# Altium PCB SM619GEFDFST.PcbDoc (part 2 of 3)
Units mm, origin at the board's own origin, x right, y up, seen from the top; angles counter-clockwise.
Board outline 101.04 x 68 mm, 8 copper layers (Top Layer, GND, VCC3+CORE, Signal 1, +5V SATA, Middle Layer 1, GND (Mid8), Bottom Layer), stack 0.633 mm thick; 196 components, 107 nets, 647 pads, 641 vias.
Unrouted connection lines stored in the file: 30.
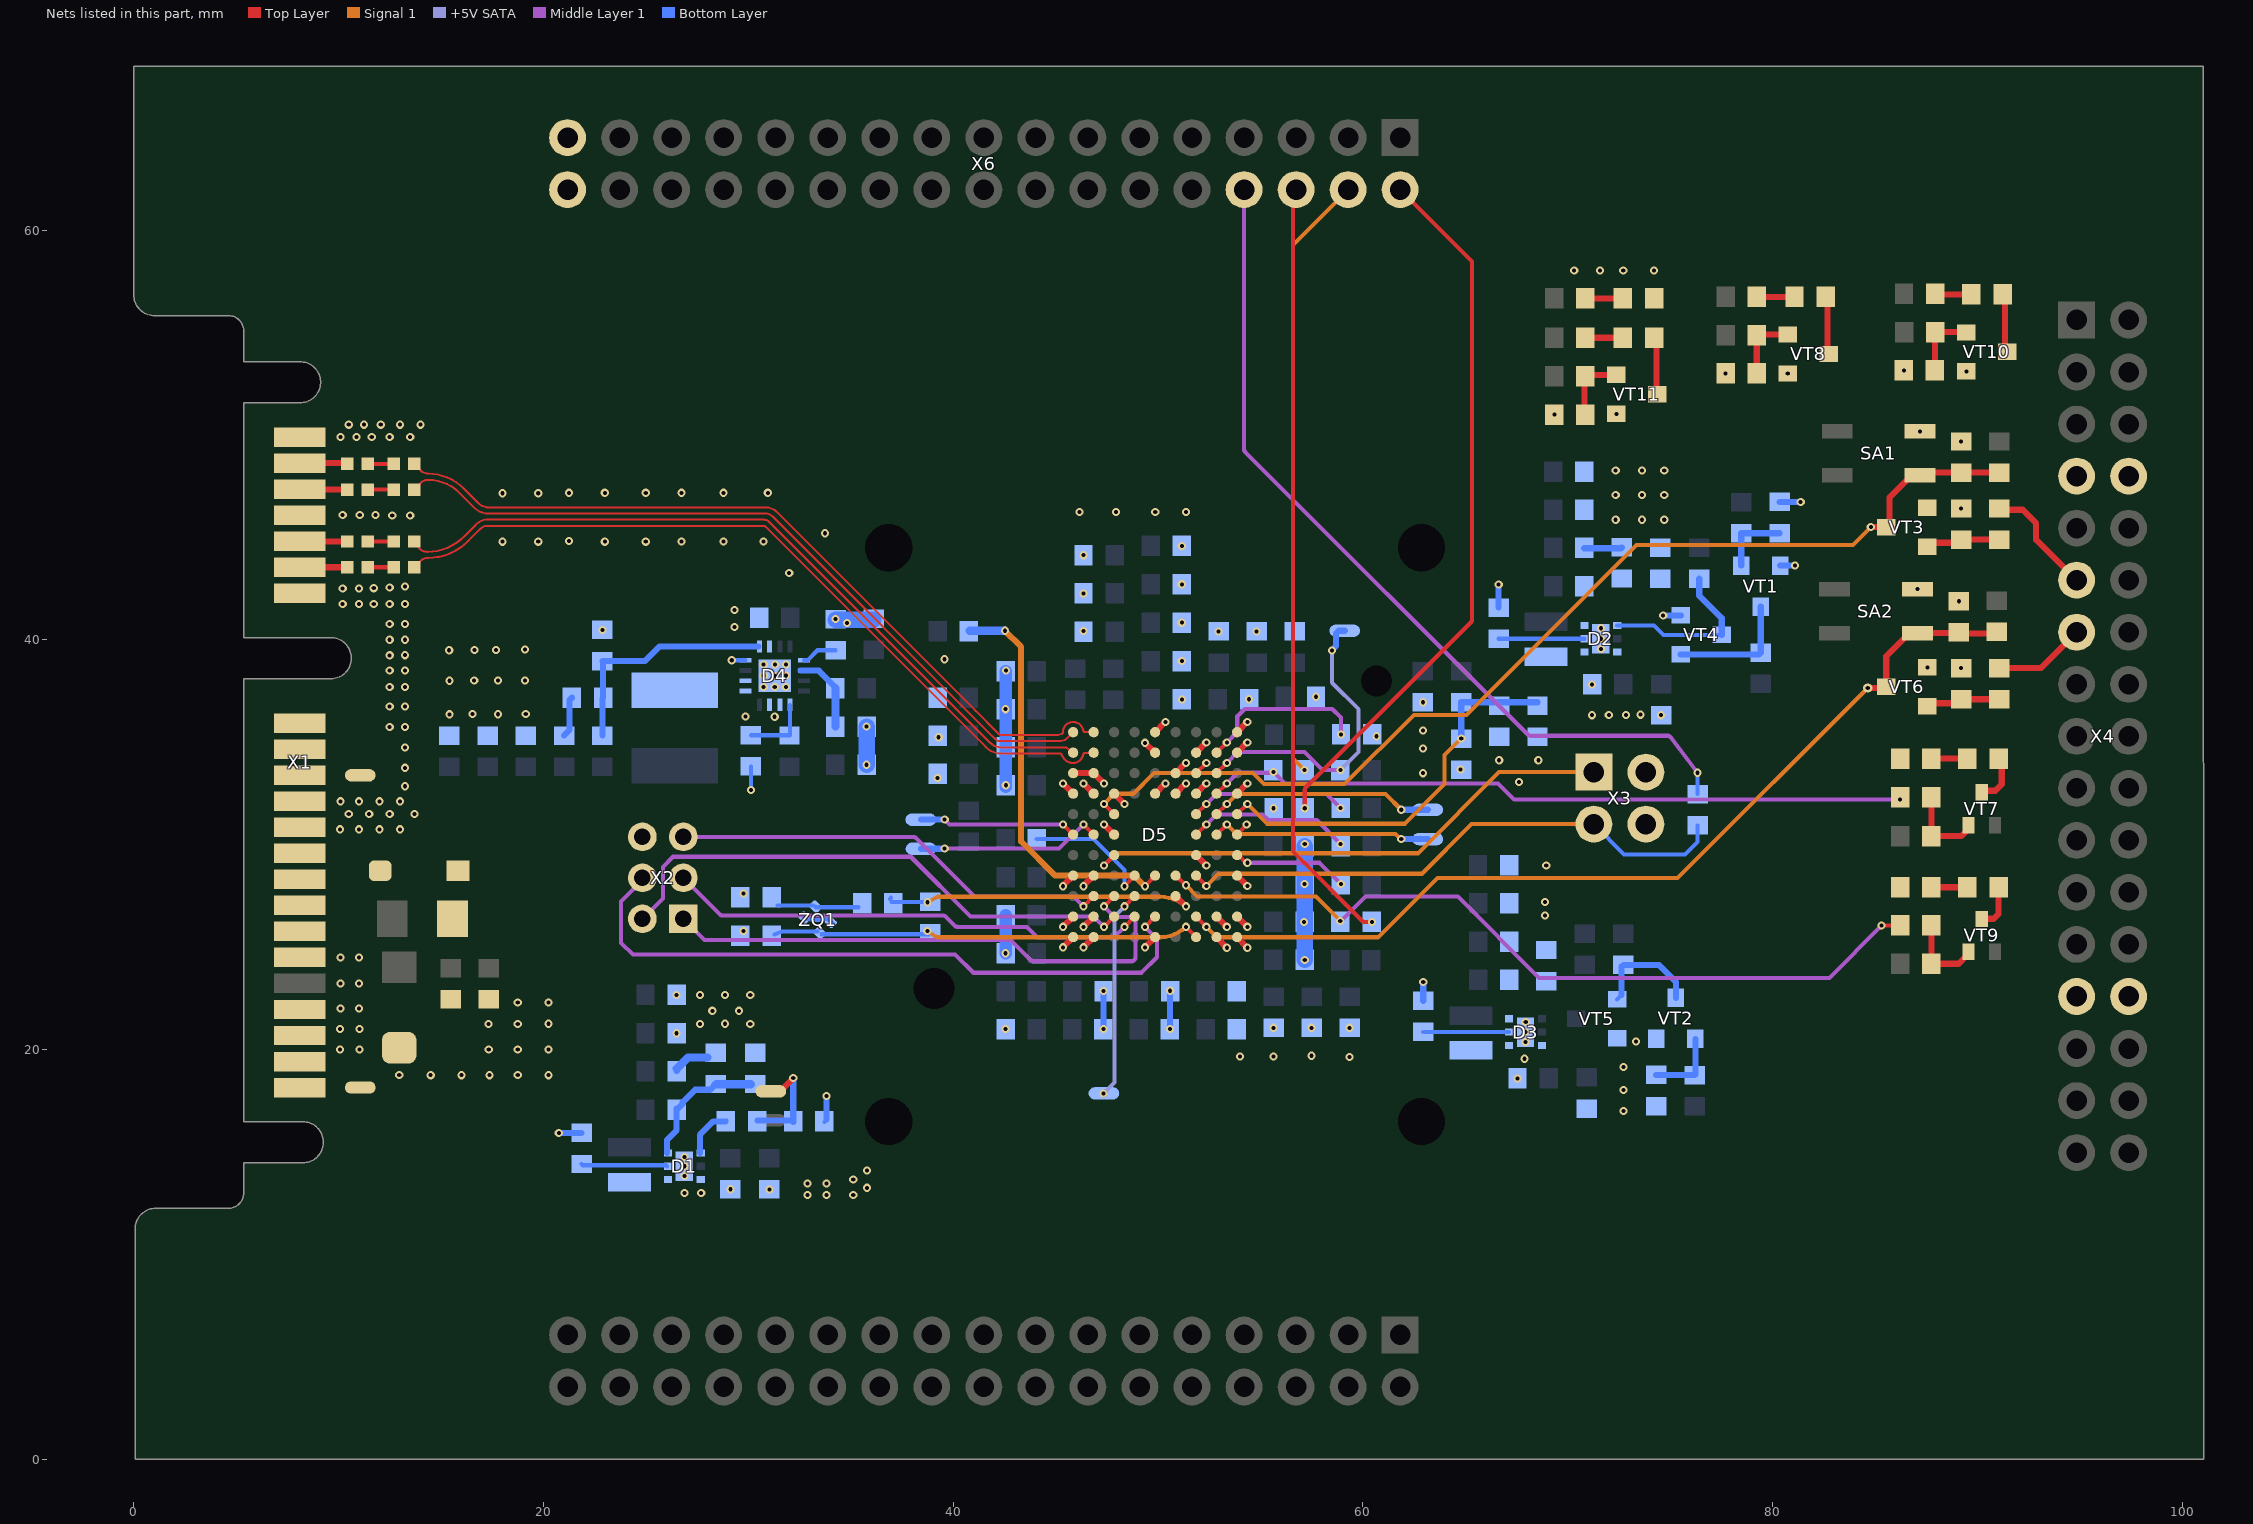
[diagram p8: the nets of this part, all layers, seen from the top]

## Via types
v1: diameter 0.4, hole 0.2, Top Layer to Bottom Layer, tented both sides, 636 vias
v2: diameter 0.4, hole 0.2, Top Layer to Bottom Layer, 3 vias
v3: diameter 0.45, hole 0.2, Top Layer to Bottom Layer, tented both sides, 2 vias

## Nets (pads, with @x,y where several pads share a name; then routed paths per layer and width w, separated by ;. In a path a pad name is that pad's centre, name@x,y a point inside that pad or via, vN(x,y) a via of type N, cw(c..) or ccw(c..) an arc to the next point about the centre after c; other vN are vias at no path point) (continued)
GND: C1.1 C2.1 C3.1 C4.1 C5.2 C6.1 C7.1 C12.2 C16.2 C17.1 C18.2 C19.2 C20.1 C21.2 C22.2 C23.2 C24.2 C25.2 C26.2 C27.2 C28.2 C29.2 C30.2 C31.2 C32.2 C33.2 C34.2 C35.2 C36.2 C37.2 C38.2 C39.2 C40.2 C41.2 C42.2 C43.2 C44.1 C45.2 C46.2 C47.2 C48.2 C49.2 C50.2 C51.2 C52.2 C53.2 C54.2 C55.2 C56.2 C57.2 C59.2 C60.2 C61.2 C62.2 C63.2 C64.2 C65.2 C66.2 C67.2 C68.2 C69.2 C70.2 C71.2 C72.2 C73.2 D1.6 D1.7 D2.6 D2.7 D3.6 D3.7 D4.6 D4.14 D4.15 D4.17 D5.A1 D5.A2 D5.A5 D5.A8 D5.A9 D5.B1 D5.B2 D5.B8 D5.B9 D5.D1 D5.D8 D5.D9 D5.E3 D5.F7 D5.H1 D5.H3 D5.H4 D5.H5 D5.H7 D5.H8 D5.H9 D5.J3 D5.J4 D5.J8 D5.J9 D5.K1 D5.K3 D5.K5 D5.L1 D5.L5 R3.1 R4.1 R8.1 R11.2 R14.1 R15.1 R25.1 R26.2 R27.2 R31.1 R33.2 R47.2 R59.1 R65.1 R66.2 R73.2 R74.1 R75.1 SA1.4 SA2.4 VD2.1 VD3.2 VT1.2 VT2.2 VT3.2 VT4.2 VT5.2 VT6.2 VT8.2 VT10.2 VT11.2 X1.1 X1.4 X1.7 X1.11 X1.12 X1.13 X1.17 X1.19 X2.6 X3.2 X3.4 X4.4 X4.14 X4.21 X4.31 X6.17 X6.34 ZQ1.2 ZQ1.4 | length 50.5
  Top Layer w0.2: D5.J3@51.861,33.49 v1(52.361,33.99)
  Top Layer w0.3: v1(45.361,24.99) D5.A9@45.861,25.49 ; v1(45.361,25.99) D5.B9@45.861,26.49 ; v1(45.361,27.97) 45.409,28.034 cw(c45.649,27.853) 45.437,28.066 D5.D9@45.861,28.49 ; v1(45.361,32.99) D5.H9@45.861,32.49 ; D5.J9@45.861,33.49 D5.J8@46.861,33.49 v1(47.361,32.99) ; v1(46.361,24.99) D5.A8@46.861,25.49 ; v1(46.361,25.99) D5.B8@46.861,26.49 ; v1(46.361,27.97) 46.409,28.034 cw(c46.649,27.853) 46.437,28.066 D5.D8@46.861,28.49 ; v1(46.361,32.99) D5.H8@46.861,32.49 ; v1(47.361,30.99) D5.F7@47.861,30.49 ; D5.H7@47.861,32.49 v1(48.361,31.99) ; v1(49.361,24.99) D5.A5@49.861,25.49 ; v1(49.361,34.972) D5.K5@49.861,34.49 ; D5.H5@49.861,32.49 v1(50.361,32.99) ; D5.L5@49.861,35.49 v1(50.361,35.99) ; D5.H4@50.861,32.49 v1(51.361,32.99) ; D5.J4@50.861,33.49 v1(51.361,33.99) ; D5.E3@51.861,29.49 v1(52.361,28.99) ; D5.H3@51.861,32.49 v1(52.361,32.99) ; D5.K3@51.861,34.49 v1(52.361,34.99) ; D5.A2@52.861,25.49 52.861,25.48 53.361,24.98 v1(53.361,24.97) ; D5.B2@52.861,26.49 v1(53.361,25.99) ; D5.A1@53.861,25.49 53.861,25.48 54.361,24.98 v1(54.361,24.97) ; D5.B1@53.861,26.49 v1(54.361,25.99) ; D5.D1@53.861,28.49 v1(54.361,27.99) ; D5.H1@53.861,32.49 v1(54.361,32.99) ; D5.K1@53.861,34.49 v1(54.361,34.99) ; D5.L1@53.861,35.49 v1(54.361,35.99)
  Bottom Layer w0.2: v1(30.135,32.67) C39.2@30.135,33.82 ; ZQ1.2@32.749,26.442 32.905,26.368 32.906,26.367 ccw(c33.335,28.454) 33.734,26.362 cw(c33.793,26.045) 34.064,26.219 ZQ1.4@34.125,26.125
  Bottom Layer w0.3: v1(20.756,15.933) R8.1@21.865,15.933 ; v1(35.775,33.9) C30.2@35.777,33.902 ; C29.2@36.097,41.01 C29.2@36.117,41.03 ; v1(47.336,21) 47.341,21 v1(47.341,22.865) ; v1(50.585,21.01) 50.595,21.01 v1(50.595,22.87) ; R15.1@62.95,22.38 v1(62.95,23.3) ; R14.1@66.63,41.57 v1(66.63,42.7) ; v1(74.66,41.19) VT4.2@75.52,41.19 ; R3.1@80.35,46.73 v1(81.37,46.73) ; VT1.2@80.37,43.62 v1(81.1,43.62)
  Bottom Layer w0.6: v1(42.565,24.7) C60.2@42.565,26.55 ; C45.2@42.565,32.811 C31.2@42.565,38.47
  Bottom Layer w0.8: C57.2@34.267,40.985 C29.2@36.097,40.985 ; C30.2@35.777,33.902 v1(35.777,35.762) ; C47.2@57.155,24.38 C55.2@57.155,29.93
  other v1: 32.9,12.906 33.828,12.906 35.124,12.906 26.892,13 27.705,13 35.791,13.25 32.9,13.456 33.828,13.456 35.124,13.654 26.887,13.829 35.791,14.099 26.887,14.304 26.887,14.759 72.72,17 72.72,18.02 67.55,18.59 12.965,18.765 14.5,18.75 16,18.75 17.375,18.75 18.75,18.765 20.25,18.75 72.72,19.15 67.885,19.55 59.355,19.63 54,19.66 55.645,19.66 57.495,19.695 10.075,20 11.021,20 17.335,20 18.75,20 20.25,20 67.94,20.374 73.34,20.394 26.505,20.797 67.94,20.85 10.075,21 11.021,21 42.56,21 55.645,21.06 57.495,21.06 59.355,21.06 17.321,21.25 18.75,21.25 20.25,21.26 27.644,21.25 28.874,21.26 30.097,21.25 67.95,21.35 28.248,21.89 29.549,21.89 10.092,22 11,22 18.75,22.3 20.25,22.3 26.505,22.663 27.644,22.663 28.874,22.663 30.097,22.663 10.092,23.225 11,23.225 57.165,24.37 10.092,24.495 11,24.495 29.769,25.79 57.135,26.23 68.888,26.536 68.888,27.2 29.769,27.61 57.155,28.08 68.95,28.99 57.165,30.03 10.075,30.75 11,30.75 12,30.75 13,30.75 10.5,31.5 11.5,31.5 12.5,31.5 13.705,31.5 10.092,32.115 11,32.115 12,32.115 13,32.115 13.25,32.85 42.575,32.9 67.615,33.06 39.245,33.25 62.931,33.49 64.765,33.668 13.25,33.75 66.655,34.12 68.565,34.12 62.931,34.695 13.25,34.75 39.296,35.244 60.661,35.29 62.93,35.577 12.5,35.75 13.25,35.75 31.29,36.244 29.87,36.25 71.19,36.32 74.56,36.32 72.006,36.33 72.84,36.33 73.55,36.345 15.42,36.362 17.794,36.367 16.543,36.379 19.142,36.379 42.565,36.613 12.5,36.75 13.25,36.75 62.93,36.95 51.175,37.09 54.445,37.1 57.715,37.22 12.5,37.69 13.25,37.69 30.755,37.69 31.295,37.69 31.835,37.69 71.19,37.82 15.42,38 16.624,38.007 17.794,38.007 19.108,38.017 30.755,38.25 31.305,38.24 31.845,38.25 12.5,38.5 13.25,38.5 42.582,38.5 89.205,38.62 87.552,38.653 30.755,38.8 31.305,38.8 31.845,38.8 51.165,38.963 39.586,39.049 12.5,39.241 13.25,39.25 15.405,39.49 16.644,39.507 17.693,39.507 19.108,39.527 71.62,39.547 12.5,40 13.25,40 71.62,40.05 52.955,40.41 54.81,40.41 46.366,40.436 22.885,40.48 71.62,40.565 12.5,40.773 13.25,40.773 34.82,40.825 51.165,40.835 34.267,41.01 10.205,41.75 11,41.75 11.722,41.75 12.5,41.75 13.25,41.75 89.095,41.88 46.365,42.26 87.07,42.475 10.205,42.5 11,42.5 11.722,42.52 12.5,42.558 13.25,42.595 51.165,42.707 32,43.265 46.365,44.13 51.165,44.58 18,44.79 19.75,44.79 23,44.79 25,44.79 26.75,44.8 28.801,44.8 30.75,44.8 21.25,44.815 33.75,45.2 72.34,45.86 73.62,45.86 74.71,45.86 12.625,46.062 13.5,46.062 10.205,46.085 11.04,46.085 11.813,46.086 46.165,46.24 47.958,46.24 49.865,46.24 51.361,46.24 89.205,46.41 72.34,47.06 73.62,47.06 74.71,47.06 18,47.151 19.75,47.151 21.25,47.174 23,47.174 25,47.174 26.75,47.174 28.801,47.174 30.956,47.174 72.34,48.27 73.62,48.27 74.71,48.27 89.205,49.68 10.092,49.895 10.877,49.895 11.627,49.895 12.5,49.895 13.5,49.895 87.2,50.175 10.5,50.5 11.25,50.5 12.065,50.5 13,50.5 14,50.5 69.345,50.99 77.71,53 80.74,53 89.455,53.1 86.405,53.15 70.315,58.025 71.575,58.025 72.71,58.025 74.215,58.025
  other v2: 31.034,13.173 29.134,13.183 72.375,51.03
IOVREFQ: C16.1 C21.1 D5.G1 R24.1 R25.2 | length 19.6
  Top Layer w0.2: D5.G1@53.861,31.49 v1(54.361,31.99)
  Signal 1 w0.2: v1(54.361,31.99) 55.329,31.022 62.051,31.022 63.992,32.963 63.992,34.369 v1(64.802,35.18)
  Bottom Layer w0.3: R24.1@64.795,36.95 R24.1@64.802,36.95 ; v1(64.802,35.18) R24.1@64.802,36.95 ; C21.1@68.525,36.948 68.525,36.95 66.66,36.95 R24.1@64.802,36.95
JRST: D5.C7 X2.1 | length 27.4
  Top Layer w0.2: v1(47.361,26.99) D5.C7@47.861,27.49
  Middle Layer 1 w0.2: X2.1@26.835,26.38 27.875,25.34 42.732,25.34 cw(c42.732,25.14) 42.873,25.282 43.787,24.368 ccw(c43.929,24.509) 43.929,24.309 48.7,24.309 ccw(c48.7,24.509) 48.9,24.509 48.9,26.36 48.785,26.475 ccw(c48.749,26.226) 48.749,26.477 47.957,26.477 cw(c47.957,26.677) 47.815,26.536 v1(47.361,26.99)
JTCK: D5.C8 X2.5 | length 21.6
  Top Layer w0.2: v1(46.361,26.99) D5.C8@46.861,27.49
  Middle Layer 1 w0.2: X2.5@26.835,30.38 38.052,30.38 cw(c38.052,30.18) 38.194,30.321 40.996,27.519 ccw(c41.138,27.66) 41.138,27.46 45.808,27.46 cw(c45.808,27.26) 45.95,27.401 v1(46.361,26.99)
JTDI: D5.B6 X2.3 | length 23.6
  Top Layer w0.2: v1(48.361,25.99) D5.B6@48.861,26.49
  Middle Layer 1 w0.2: X2.3@26.835,28.38 28.621,26.594 ccw(c28.762,26.736) 28.762,26.536 39.506,26.536 cw(c39.506,26.336) 39.648,26.477 40.076,26.049 ccw(c40.218,26.19) 40.218,25.99 43.512,25.99 cw(c43.512,25.79) 43.654,25.931 44.067,25.518 ccw(c44.208,25.66) 44.207,25.46 47.831,25.46 v1(48.361,25.99)
JTDO: D5.B5 X2.4 | length 33.1
  Top Layer w0.2: v1(49.361,25.99) D5.B5@49.861,26.49
  Middle Layer 1 w0.2: X2.4@24.835,28.38 24.835,28.266 23.799,27.23 23.799,25.21 24.377,24.632 40.103,24.632 40.985,23.75 49.199,23.75 49.955,24.506 49.955,25.396 v1(49.361,25.99)
JTMS: D5.B7 X2.2 | length 26.8
  Top Layer w0.2: v1(47.361,25.99) D5.B7@47.861,26.49
  Middle Layer 1 w0.2: X2.2@24.835,26.38 25.835,27.38 25.835,28.916 26.329,29.41 37.934,29.41 40.855,26.489 46.862,26.489 v1(47.361,25.99)
nDASP: D5.H2 R54.2 R60.2 | length 34.4
  Top Layer w0.2: D5.H2@52.861,32.49 v1(53.361,32.99)
  Middle Layer 1 w0.2: v1(53.361,32.99) 53.881,33.51 55.615,33.51 v1(55.645,33.54) 56.195,32.99 66.605,32.99 67.389,32.206 v3(86.225,32.206)
nDASP_F: R54.1 X6.19 | length 29.7
  Top Layer w0.2: X6.19@59.075,61.764 X6.19@59.281,61.97
  Signal 1 w0.2: v1(57.155,33.64) 56.582,34.213 56.582,59.271 X6.19@59.075,61.764
nDF: D5.F1 R55.2 | length 0.7
  Top Layer w0.2: D5.F1@53.861,30.49 53.861,30.5 54.33,30.969 v1(54.33,30.979)
  other v1: 55.645,31.78
nDF_F: R55.1 X6.18 | length 35
  Top Layer w0.2: v1(57.165,31.78) 57.165,32.663 cw(c57.365,32.662) 57.223,32.803 65.267,40.847 ccw(c65.125,40.988) 65.325,40.988 65.325,58.466 X6.18@61.821,61.97
NetC8_1: C8.1 R17.1 | length 1.3
  Top Layer w0.2: C8.1@11.425,48.59 R17.1@12.705,48.59
NetC8_2: C8.2 X1.2 | length 2.3
  Top Layer w0.2: C8.2@10.425,48.59 C8.2@10.425,48.625
  Top Layer w0.3: X1.2@8.115,48.625 C8.2@10.425,48.625
NetC9_1: C9.1 R18.1 | length 1.3
  Top Layer w0.2: C9.1@11.425,47.33 R18.1@12.705,47.33
NetC9_2: C9.2 X1.3 | length 2.3
  Top Layer w0.2: X1.3@8.115,47.33 X1.3@8.115,47.355
  Top Layer w0.3: X1.3@8.115,47.33 C9.2@10.425,47.33
NetC10_1: C10.1 R19.1 | length 1.3
  Top Layer w0.2: C10.1@11.425,44.8 R19.1@12.705,44.8
NetC10_2: C10.2 X1.5 | length 2.3
  Top Layer w0.2: X1.5@8.115,44.8 X1.5@8.115,44.815
  Top Layer w0.3: X1.5@8.115,44.8 C10.2@10.425,44.8
NetC11_1: C11.1 R20.1 | length 1.3
  Top Layer w0.2: C11.1@11.425,43.54 R20.1@12.705,43.54
NetC11_2: C11.2 X1.6 | length 2.3
  Top Layer w0.2: X1.6@8.115,43.54 X1.6@8.115,43.545
  Top Layer w0.3: X1.6@8.115,43.54 C11.2@10.425,43.54
NetC13_2: C13.2 D1.3 R23.1 R26.1 | length 6.5
  Bottom Layer w0.3: D1.3@26.044,14.953 26.044,15.59 26.505,16.051 C13.2@26.505,17.113 ; C13.2@26.505,17.063 26.805,17.363 26.805,17.431 27.415,18.041 28.136,18.041 R23.1@28.413,18.318 ; R23.1@28.331,18.261 R23.1@28.361,18.291
  Bottom Layer w0.4: R23.1@28.441,18.306 R26.1@30.121,18.306
NetC14_2: C14.2 D3.3 R30.1 R31.2
NetC15_2: C15.2 D2.3 R29.1 R33.1
NetC28_1: C28.1 R36.1 ZQ1.3 | length 3.9
  Bottom Layer w0.2: C28.1@31.427,27.04 ZQ1.3@33.164,27.04 ; ZQ1.3@33.279,26.972 33.31,26.942 ZQ1.3@33.485,26.942 ; ZQ1.3@33.441,26.947 R36.1@35.375,26.947
NetC39_1: C39.1 D4.13 R41.1 | length 3.4
  Bottom Layer w0.2: C39.1@30.135,35.34 32.025,35.34 32.045,35.36 D4.13@32.045,36.825
NetC44_2: C44.2 D4.10 R42.1 | length 4
  Bottom Layer w0.2: R42.1@34.255,37.69 R42.1@34.255,37.64 R42.1@34.257,37.638
  Bottom Layer w0.3: D4.10@32.567,38.5 D4.10@32.72,38.5 33.445,38.5 R42.1@34.255,37.69
  Bottom Layer w0.4: C44.2@34.257,35.762 R42.1@34.257,37.638
NetC57_1: C57.1 D4.9 | length 1.8
  Bottom Layer w0.2: D4.9@32.72,39 32.9,39 33.39,39.49 C57.1@34.267,39.49
NetC58_2: C58.2 D4.5 R46.1 R47.1 | length 11.6
  Bottom Layer w0.3: C58.2@22.885,35.32 22.885,37.14 R46.1@22.915,37.17 22.915,38.93 R47.1@22.885,38.96 24.955,38.96 25.67,39.675 D4.5@30.488,39.675
NetD1_1: D1.1 L1.1
NetD1_2: D1.2 R8.2 | length 4.2
  Bottom Layer w0.2: R8.2@21.865,14.413 21.925,14.353 25.994,14.353 D1.2@26.044,14.303
NetD1_4: D1.4 R12.1 | length 2.5
  Bottom Layer w0.2: R12.1@28.881,16.49 R12.1@28.934,16.543
  Bottom Layer w0.3: D1.4@27.644,14.953 27.644,15.833 28.301,16.49 R12.1@28.881,16.49
NetD2_1: D2.1 L2.1
NetD2_2: D2.2 R14.2 | length 4.2
  Bottom Layer w0.2: R14.2@66.63,40.05 D2.2@70.82,40.05
NetD2_4: D2.4 R9.1 VT4.3 | length 8.5
  Bottom Layer w0.2: D2.4@72.42,40.7 74.21,40.7 74.67,40.24 VT4.3@77.52,40.24
  Bottom Layer w0.3: R9.1@76.42,42.98 76.42,42.16 77.52,41.06 VT4.3@77.52,40.24
NetD3_1: D3.1 L3.1
NetD3_2: D3.2 R15.2 | length 4.2
  Bottom Layer w0.2: R15.2@62.95,20.86 62.96,20.85 D3.2@67.14,20.85
NetD4_1: D4.1 D4.2 L4.1
NetD5_C6: D5.C6 nPGIN.1 | length 10.3
  Top Layer w0.2: v1(48.361,26.99) D5.C6@48.861,27.49
  +5V SATA w0.2: v1(47.339,17.86) 47.874,18.395 47.874,26.503 v1(48.361,26.99)
  Bottom Layer w0.3: v1(47.339,17.86) 47.361,17.838 nPGIN.1@47.361,17.81
NetD5_D5: D5.D5 R43.1 | length 20.1
  Top Layer w0.2: v1(49.361,27.97) 49.772,28.401 cw(c49.916,28.263) 49.775,28.404 D5.D5@49.861,28.49
  Signal 1 w0.3: v1(42.533,40.441) 43.321,39.653 43.321,30.155 44.985,28.49 48.841,28.49 v1(49.361,27.97)
  Bottom Layer w0.2: R43.1@40.765,40.41 R43.1@40.796,40.441
  Bottom Layer w0.4: R43.1@40.796,40.441 v1(42.533,40.441)
NetD5_D6: D5.D6 R53.2 | length 6.4
  Top Layer w0.2: v1(48.361,27.97) 48.772,28.401 cw(c48.917,28.263) 48.775,28.404 D5.D6@48.861,28.49
  Bottom Layer w0.2: R53.2@44.085,30.27 46.849,30.27 48.361,28.758 v1(48.361,27.97)
NetD5_E1: D5.E1 R58.2 | length 5.6
  Top Layer w0.2: D5.E1@53.861,29.49 53.933,29.49 54.307,29.116 v1(54.361,29.116)
  Middle Layer 1 w0.2: v1(54.361,29.116) 57.889,29.116 v1(58.925,28.08)
NetD5_F2: D5.F2 KP9.1 | length 10.8
  Top Layer w0.2: D5.F2@52.861,30.49 v1(53.361,30.99)
  Signal 1 w0.2: v1(53.361,30.99) 53.83,30.521 61.598,30.521 61.849,30.269 v1(61.876,30.269)
  Bottom Layer w0.3: v1(61.876,30.269) KP9.1@63.17,30.269
NetD5_F8: D5.F8 KP6.1 | length 9.1
  Top Layer w0.2: v1(46.361,30.99) D5.F8@46.861,30.49
  Middle Layer 1 w0.2: v1(39.59,29.808) 45.179,29.808 v1(46.361,30.99)
  Bottom Layer w0.3: KP6.1@38.432,29.8 38.436,29.804 39.586,29.804 v1(39.59,29.808)
NetD5_F9: D5.F9 KP8.1 | length 7.7
  Top Layer w0.2: v1(45.361,30.99) D5.F9@45.861,30.49
  Middle Layer 1 w0.2: v1(39.59,31.234) 39.834,30.99 v1(45.361,30.99)
  Bottom Layer w0.3: KP8.1@38.425,31.22 38.432,31.227 39.583,31.227 v1(39.59,31.234)
NetD5_G2: D5.G2 KP10.1 | length 11
  Top Layer w0.2: D5.G2@52.861,31.49 v1(53.361,31.99)
  Signal 1 w0.2: v1(53.361,31.99) 53.851,32.48 61.101,32.48 v1(61.876,31.705)
  Bottom Layer w0.3: v1(61.876,31.705) KP10.1@63.17,31.705
NetD5_J2: D5.J2 KP5.1 R57.2 | length 15
  Top Layer w0.2: D5.J2@52.861,33.49 v1(53.361,33.99)
  Middle Layer 1 w0.2: v1(53.361,33.99) 53.891,34.52 57.157,34.52 58.037,33.64 v1(58.905,33.64)
  +5V SATA w0.2: v1(58.495,39.472) 58.495,37.904 59.787,36.612 59.787,34.522 v1(58.905,33.64)
  Bottom Layer w0.3: v1(58.495,39.472) 58.495,39.499 58.687,39.691 58.687,40.302 58.826,40.441 KP5.1@59.115,40.441
NetD5_K2: D5.K2 R59.2 | length 8.4
  Top Layer w0.2: D5.K2@52.861,34.49 v1(53.361,34.99)
  Middle Layer 1 w0.2: v1(53.361,34.99) 53.869,35.498 53.869,36.266 54.235,36.632 58.508,36.632 58.932,36.207 v1(58.932,35.38)
NetKP2_1: KP2.1 R5.1 R12.2 | length 4.7
  Top Layer w0.3: KP2.1@31.097,17.967 KP2.1@31.104,17.96 ; KP2.1@31.637,18.03 32.197,18.59 v1(32.197,18.614)
  Bottom Layer w0.2: R5.1@32.197,16.543 R5.1@32.204,16.543
  Bottom Layer w0.3: R12.2@30.454,16.543 R5.1@32.197,16.543 ; R5.1@32.197,16.467 R5.1@32.197,16.499 R5.1@32.197,16.543 ; v1(32.197,18.614) R5.1@32.197,16.543
NetKP3_1: KP3.1 X1.8 X1.9 X1.10
NetKP4_1: KP4.1 X1.20 X1.21 X1.22
NetR1_1: R1.1 R3.2 VT1.1 | length 3.5
  Bottom Layer w0.2: R3.2@80.34,45.2 R3.2@80.35,45.21
  Bottom Layer w0.3: VT1.1@78.47,43.62 R1.1@78.47,45.2 R3.2@80.34,45.2
NetR2_1: R2.1 R4.2 VT2.1 | length 3.7
  Bottom Layer w0.2: R4.2@74.31,18.76 R4.2@74.32,18.75 ; R2.1@76.19,18.75 R2.1@76.23,18.79
  Bottom Layer w0.3: R4.2@74.32,18.75 R2.1@76.19,18.75 ; R2.1@76.23,18.79 VT2.1@76.23,20.52
NetR6_1: R6.1 VT1.3 VT4.1 | length 6.2
  Bottom Layer w0.2: R6.1@79.34,39.29 R6.1@79.42,39.37
  Bottom Layer w0.3: VT4.1@75.52,39.29 R6.1@79.34,39.29 ; R6.1@79.42,39.37 VT1.3@79.42,41.62
NetR7_1: R7.1 VT2.3 VT5.1 | length 5.5
  Bottom Layer w0.2: VT5.1@72.41,22.45 VT5.1@72.63,22.67 ; R7.1@72.63,24.04 R7.1@72.72,24.13
  Bottom Layer w0.3: VT5.1@72.63,22.67 R7.1@72.63,24.04 ; R7.1@72.72,24.13 74.45,24.13 75.28,23.3 VT2.3@75.28,22.52
NetR11_1: R11.1 R16.2 VT3.1 | length 3.5
  Top Layer w0.3: VT3.1@87.705,44.55 87.895,44.74 89.055,44.74 R11.1@89.205,44.89 R16.2@91.055,44.89
NetR21_1: R21.1 VD1.2
NetR22_1: R22.1 R23.2 | length 1.8
  Bottom Layer w0.3: R22.1@26.515,18.953 R22.1@26.515,19.003
  Bottom Layer w0.4: R22.1@26.515,19.078 27.055,19.618 R23.2@28.015,19.618
NetR27_1: R27.1 R34.2 VT6.1 | length 3.6
  Top Layer w0.3: VT6.1@87.545,36.7 87.745,36.9 88.845,36.9 89.045,37.1 R34.2@90.945,37.1
NetR28_1: R28.1 R29.2 | length 1.8
  Bottom Layer w0.3: R28.1@70.81,44.47 72.6,44.47 R29.2@72.64,44.51
NetR45_1: R45.1 R46.2 | length 2
  Bottom Layer w0.3: R45.1@21.015,35.33 21.275,35.59 21.275,37.05 R46.2@21.395,37.17
NetR60_1: R60.1 R63.1 VT7.1 | length 3.9
  Top Layer w0.3: R63.1@87.75,30.42 R60.1@87.75,32.31 ; R63.1@87.935,30.42 89.215,30.42 89.645,30.85 VT7.1@89.645,30.95
NetR61_2: R61.2 VD3.1 | length 1.8
  Top Layer w0.3: R61.2@70.865,56.66 72.645,56.66 VD3.1@72.655,56.67
NetR62_2: R62.2 VD4.1 | length 1.8
  Top Layer w0.3: R62.2@79.23,56.74 VD4.1@81.07,56.74
NetR64_1: R64.1 R65.2 VT8.1 | length 3.4
  Top Layer w0.3: R65.2@79.23,53 R64.1@79.23,54.871 ; R64.1@79.23,54.871 79.259,54.9 VT8.1@80.74,54.9
NetR66_1: R66.1 VD5.2 | length 1.7
  Top Layer w0.3: R66.1@87.915,34.2 VD5.2@89.665,34.2
NetR67_1: R67.1 R68.1 VT9.1 | length 4
  Top Layer w0.3: R67.1@87.75,26.06 R68.1@87.75,24.19 89.08,24.19 89.56,24.67 VT9.1@89.56,24.77
NetR69_2: R69.2 VD7.1 | length 1.8
  Top Layer w0.3: R69.2@87.935,56.88 87.935,56.86 VD7.1@89.705,56.86
NetR70_2: R70.2 VD8.1 | length 1.9
  Top Layer w0.3: R70.2@70.815,54.74 VD8.1@72.695,54.74
NetR71_1: R71.1 R74.2 VT10.1 | length 3.4
  Top Layer w0.3: R74.2@87.925,53.15 87.925,55.02 R71.1@87.945,55.02 89.455,55.02 VT10.1@89.455,55
NetR72_1: R72.1 R75.2 VT11.1 | length 3.5
  Top Layer w0.3: R75.2@70.815,50.99 70.815,52.866 70.879,52.93 VT11.1@72.375,52.93
NetR73_1: R73.1 VD6.2 | length 1.7
  Top Layer w0.3: R73.1@87.76,27.92 VD6.2@89.51,27.92
NetVD1_1: VD1.1 X1.14 X1.15 X1.16
NetVD4_2: VD4.2 VT8.3 | length 2.9
  Top Layer w0.3: VD4.2@82.59,56.74 82.68,56.65 82.68,54.01 VT8.3@82.74,53.95
NetVD5_1: VD5.1 VT7.3 | length 2.3
  Top Layer w0.3: VT7.3@90.295,32.55 90.379,32.634 90.869,32.634 91.185,32.95 VD5.1@91.185,34.2
NetVD6_1: VD6.1 VT9.3 | length 2.2
  Top Layer w0.3: VT9.3@90.21,26.37 90.224,26.384 90.784,26.384 91.03,26.63 VD6.1@91.03,27.92
NetVD7_2: VD7.2 VT10.3 | length 2.9
  Top Layer w0.3: VD7.2@91.225,56.86 91.345,56.74 91.345,54.16 VT10.3@91.455,54.05
NetVD8_2: VD8.2 VT11.3 | length 2.8
  Top Layer w0.3: VD8.2@74.215,54.74 74.325,54.63 74.325,52.03 VT11.3@74.375,51.98
nHWRST: C18.1 D5.B3 R32.1 SA2.3 VT6.3 | length 46.6
  Top Layer w0.2: D5.B3@51.861,26.49 v1(52.361,25.99)
  Top Layer w0.3: v3(84.645,37.65) 85.545,37.65 85.545,39.2 86.67,40.325 SA2.3@87.07,40.325 88.94,40.325 88.955,40.31 R32.1@90.945,40.31
  Signal 1 w0.2: v1(52.361,25.99) 52.871,25.48 60.749,25.48 63.637,28.368 75.363,28.368 v3(84.645,37.65)
nSATALK: D5.D4 R56.2 R67.2 | length 39.5
  Top Layer w0.2: D5.D4@50.861,28.49 v1(51.361,28.021) ; v1(85.32,26.05) 86.22,26.05 R67.2@86.23,26.06
  Middle Layer 1 w0.2: v1(58.895,26.273) 58.938,26.273 60.134,27.469 64.634,27.469 68.603,23.5 82.77,23.5 v1(85.32,26.05)
  Signal 1 w0.2: v1(51.361,28.021) 51.912,27.47 57.715,27.47 58.895,26.29 v1(58.895,26.273)
nSATALK_F: R56.1 X6.20 | length 37.6
  Top Layer w0.2: X6.20@56.741,61.97 56.659,61.888 ccw(c56.8,61.746) 56.6,61.746 56.6,29.733 ccw(c56.8,29.733) 56.659,29.591 60.02,26.23 v1(60.445,26.23)
nSWRST: C5.1 D5.G7 R13.1 SA1.3 VT3.3 | length 52.4
  Top Layer w0.2: v1(47.361,31.99) D5.G7@47.861,31.49
  Top Layer w0.3: v1(84.795,45.5) 85.705,45.5 85.705,46.93 86.775,48 87.175,48 SA1.3@87.2,48.025 87.335,48.16 C5.1@89.205,48.16 R13.1@91.055,48.16 R13.1@91.065,48.16
  Signal 1 w0.2: v1(47.361,31.99) 47.856,32.485 48.799,32.485 49.809,33.496 54.633,33.496 55.173,32.956 59.114,32.956 62.488,36.33 65.063,36.33 73.36,44.626 83.921,44.626 v1(84.795,45.5)
PWR_GD: D4.4 R5.2 R44.2 | length 2
  Bottom Layer w0.2: v1(29.194,39) D4.4@29.87,39 ; R5.2@33.717,16.467 R5.2@33.828,16.578
  Bottom Layer w0.3: R5.2@33.828,16.578 v1(33.828,17.734)
  other v1: 29.33,40.631 29.33,41.461
RST_ROM1: R16.1 X4.6 | length 5.7
  Top Layer w0.3: R16.1@91.055,46.41 91.119,46.346 92.199,46.346 92.865,45.68 92.865,44.886 X4.6@94.841,42.91
RST_ROM2: R34.1 X4.7 | length 4.6
  Top Layer w0.3: R34.1@90.945,38.62 93.091,38.62 X4.7@94.841,40.37
RX_N: D5.L9 R18.2 | length 37.5
  Top Layer w0.1: R18.2@13.885,47.33 cw(c14.365,47.33) 14.365,47.81 cw(c14.365,45.637) 15.901,47.174 16.623,46.452 ccw(c17.322,47.151) 17.321,46.162 ccw(c17.324,47.155) 17.326,46.162 30.842,46.162 cw(c30.842,45.666) 31.193,46.017 41.937,35.273 41.948,35.262 ccw(c42.467,35.79) 41.957,35.254 cw(c41.887,35.182) 41.958,35.253 42.017,35.193 ccw(c42.231,35.403) 42.02,35.19 ccw(c42.233,35.402) 42.022,35.188 42.041,35.169 ccw(c42.326,35.45) 42.326,35.05 42.465,35.05 ccw(c42.467,35.79) 42.467,35.05 42.468,35.05 45.17,35.05 ccw(c45.17,35.656) 45.598,35.227 D5.L9@45.861,35.49
RX_P: D5.L8 R17.2 | length 39
  Top Layer w0.1: R17.2@13.885,48.59 ccw(c14.365,48.59) 14.365,48.11 cw(c14.365,45.637) 16.114,47.386 16.836,46.663 ccw(c17.324,47.155) 17.324,46.462 30.807,46.462 cw(c30.807,45.528) 30.81,46.462 30.842,46.462 cw(c30.842,45.666) 31.236,46.358 ccw(c31.285,46.445) 31.238,46.357 cw(c30.807,45.528) 31.291,46.327 cw(c31.084,45.985) 31.366,46.269 41.081,36.553 41.098,36.536 42.166,35.468 ccw(c42.238,35.538) 42.168,35.467 42.231,35.403 cw(c42.02,35.191) 42.233,35.402 42.255,35.38 ccw(c42.326,35.45) 42.326,35.35 44.927,35.35 44.928,35.35 ccw(c44.928,36.87) 45.285,35.393 ccw(c45.261,35.49) 45.361,35.489 cw(c45.861,35.49) 46.354,35.573 ccw(c46.453,35.59) 46.452,35.49 D5.L8@46.861,35.49
SCL: D5.F3 R51.2 | length 8.1
  Top Layer w0.2: D5.F3@51.861,30.49 v1(52.361,30.99)
  Middle Layer 1 w0.2: v1(52.361,30.99) 52.851,31.48 55.101,31.48 55.387,31.194 57.751,31.194 v1(58.915,30.03)
SDA: D5.G3 R52.2 | length 7.7
  Top Layer w0.2: D5.G3@51.861,31.49 v1(52.361,31.99)
  Middle Layer 1 w0.2: v1(52.361,31.99) 52.851,32.48 58.225,32.48 v1(58.915,31.79)
TX_N: D5.K8 R20.2 | length 38.8
  Top Layer w0.1: R20.2@13.705,43.54 13.955,43.79 cw(c14.042,43.741) 13.96,43.798 cw(c14.327,43.54) 14.281,43.986 14.348,43.993 cw(c14.359,43.894) 14.357,43.994 14.364,43.994 ccw(c14.33,46.833) 16.339,44.826 16.878,45.365 ccw(c16.593,45.646) 16.892,45.381 cw(c17.305,45.018) 17.236,45.563 cw(c17.248,45.464) 17.252,45.564 ccw(c17.322,47.151) 17.321,45.562 17.326,45.562 30.758,45.562 cw(c30.758,45.462) 30.829,45.533 41.587,34.775 41.593,34.768 41.614,34.748 ccw(c42.326,35.451) 42.238,34.454 42.277,34.45 ccw(c42.286,34.55) 42.286,34.45 45.208,34.45 cw(c45.208,34.35) 45.303,34.382 ccw(c45.861,34.583) 45.36,34.265 ccw(c45.861,34.583) 45.861,33.99 ccw(c45.861,34.49) 46.352,34.398 cw(c46.451,34.378) 46.45,34.478 46.814,34.478 ccw(c46.814,34.578) D5.K8@46.861,34.49
TX_P: D5.K9 R19.2 | length 37.5
  Top Layer w0.1: R19.2@13.705,44.8 R19.2@13.879,44.55 ; R19.2@13.879,44.549 ccw(c14.313,44.8) 14.264,44.301 14.334,44.294 ccw(c14.344,44.394) 14.344,44.294 ccw(c14.33,46.833) 16.126,45.037 16.665,45.576 ccw(c16.593,45.646) 16.668,45.58 cw(c17.305,45.018) 17.199,45.861 cw(c17.248,45.464) 17.263,45.864 ccw(c17.322,47.151) 17.322,45.862 17.4,45.862 30.758,45.862 cw(c30.758,45.462) 31.041,45.745 39.045,37.741 41.799,34.987 ; 41.799,34.987 41.804,34.982 ccw(c42.364,35.54) 41.809,34.977 41.827,34.959 ccw(c42.326,35.451) 42.326,34.75 42.331,34.75 45.485,34.75 cw(c45.471,34.651) 45.53,34.731 ccw(c46.482,36.004) 45.804,34.567 cw(c45.761,34.476) 45.858,34.5 D5.K9@45.861,34.49
UART_RX: D5.E7 X3.1 | length 26.5
  Top Layer w0.2: v1(47.361,28.99) D5.E7@47.861,29.49
  Signal 1 w0.2: v1(47.361,28.99) 47.95,29.579 62.694,29.579 66.655,33.54 X3.1@71.275,33.54
UART_TX: D5.D3 R76.2 X3.3 | length 27.6
  Top Layer w0.2: D5.D3@51.861,28.49 v1(52.361,27.99)
  Signal 1 w0.2: v1(52.361,27.99) 52.951,28.58 62.885,28.58 65.305,31 X3.3@71.275,31
  Bottom Layer w0.2: X3.3@71.275,31 72.755,29.52 75.73,29.52 76.335,30.125 R76.2@76.335,30.945
UART_TX_F: R76.1 X6.21 | length 42.6
  Middle Layer 1 w0.2: X6.21@54.201,61.97 54.201,49.307 ccw(c54.401,49.307) 54.259,49.166 68.05,35.376 ; 68.05,35.375 ccw(c68.191,35.517) 68.19,35.317 74.869,35.317 cw(c74.869,35.117) 75.028,35.238 v1(76.335,33.51)
  Bottom Layer w0.2: R76.1@76.335,32.465 v1(76.335,33.51)
XTAL1: C27.1 D5.A3 R35.1 ZQ1.1 | length 21.1
  Top Layer w0.2: v1(51.361,25.99) D5.A3@51.861,25.49
  Signal 1 w0.2: v1(38.743,25.79) 39.162,25.513 ccw(c39.272,25.68) 39.272,25.48 50.13,25.48 ccw(c50.13,27.221) v1(51.361,25.99)
  Bottom Layer w0.2: C27.1@31.289,25.623 31.639,25.761 ZQ1.1@33.376,25.761 ; ZQ1.1@33.577,25.626 R35.1@38.823,25.626 ; R35.1@38.643,25.78 38.734,25.689 38.735,25.703 38.741,25.771 v1(38.743,25.79)
XTAL2: D5.C4 R35.2 R36.2 | length 15.4
  Top Layer w0.3: D5.C4@50.861,27.49 v1(51.361,26.99)
  Signal 1 w0.2: v1(38.746,27.19) 39.205,27.436 cw(c39.3,27.26) 39.3,27.46 50.087,27.46 cw(c50.076,25.47) v1(51.361,26.99) v1(51.361,26.99)
  Bottom Layer w0.2: R36.2@36.92,27.351 R36.2@36.978,27.409 ; R36.2@36.985,27.209 38.734,27.209 v1(38.746,27.19)
pads on no net: D4.3 D4.7 D4.8 D4.16 D5.0 D5.C1 SA1.1 SA1.2 SA2.1 SA2.2 X1.18 X4.1 X4.2 X4.3 X4.5 X4.8 X4.9 X4.10 X4.11 X4.12 X4.13 X4.15 X4.16 X4.17 X4.18 X4.19 X4.20 X4.22 X4.23 X4.24 X4.25 X4.26 X4.27 X4.28 X4.29 X4.30 X4.32 X4.33 X4.34 X5.1 X5.2 X5.3 X5.4 X5.5 X5.6 X5.7 X5.8 X5.9 X5.10 X5.11 X5.12 X5.13 X5.14 X5.15 X5.16 X5.17 X5.18 X5.19 X5.20 X5.21 X5.22 X5.23 X5.24 X5.25 X5.26 X5.27 X5.28 X5.29 X5.30 X5.31 X5.32 X5.33 X5.34 X6.1 X6.2 X6.3 X6.4 X6.5 X6.6 X6.7 X6.8 X6.9 X6.10 X6.11 X6.12 X6.13 X6.14 X6.15 X6.16 X6.22 X6.23 X6.24 X6.25 X6.26 X6.27 X6.28 X6.29 X6.30 X6.31 X6.32 X6.33

## Polygon pours and split planes (outlines as drawn)
+3.3V_VCC3 on VCC3+CORE "NONET_L-01_P-001" (solid, remove dead copper, pour order 88): 58.85,47.675 79.875,47.675 83.825,51.625 84.575,52.375 91.9,52.375 92.293,51.982 92.293,24.718 89.575,22 83.701,22 81.335,24.367 81.335,35.676 75.311,41.7 70.275,41.7 66.325,37.75 66.325,29.847 65.932,29.454 59.723,29.454 59.45,29.727 59.45,35.535 58.541,36.444 54.377,36.444 51.85,33.917 51.85,32.376 47.941,28.467 47.941,26.636 47.654,26.348 45.174,26.348 44.875,26.049 44.875,25.175 43.255,23.555 42.196,23.555 41.725,24.026 41.725,30.55 42.324,31.15 43.325,32.15
+3.3V_VCC3F on VCC3+CORE "Bottom Layer-+3.3V_VCC3F" (solid, remove dead copper, pour order 62): 43.751,20.324 55.911,20.324 58.045,22.457 58.045,33.47 57.126,34.389 54.242,34.389 53.881,34.029 53.881,32.648 53.719,32.486 53.041,32.486 52.802,32.247 52.802,27.946 52.387,27.531 49.402,27.531 48.878,27.007 48.878,25.826 48.532,25.48 47.351,25.48 46.941,25.07 46.941,24.408 45.82,23.287 44.062,23.287 43.485,22.711 43.485,20.59
+1.1V_CORE on VCC3+CORE "NONET_L-01_P-001" (solid, remove dead copper, pour order 84): 81.559,9.21 81.559,16.71 80.682,17.587 41.305,17.587 39.438,19.454 39.438,29.451 59.047,49.06 73.584,49.06 77.059,52.535 77.059,55.135 76.784,55.41 75.975,55.41 72.175,59.21 45.663,59.21 22.384,35.932 22.384,9.885 24.809,7.46 79.809,7.46
+1.1V_VCCK on Bottom Layer "NONET_L-01_P-001" (solid, remove dead copper, pour order 13): 51.652,36.184 51.652,34.553 51.542,34.443 50.777,34.443 50.298,34.443 49.811,33.955 49.811,32.939 49.531,32.659 48.192,32.659 48.04,32.811 48.04,35.691 47.242,36.489 47.242,37.431 47.33,37.519 48.324,37.519 48.781,37.976 48.781,39.454 48.505,39.73 47.524,39.73 47.44,39.815 47.44,44.925 47.781,45.266 49.967,45.266 50.114,45.118 50.114,36.3 50.954,36.3 51.535,36.3
+3.3V_VCC3F on Bottom Layer "NONET_L-01_P-001" (solid, pour order 133): 43.625,23.428 43.625,20.492 43.673,20.444 46.249,20.444 46.301,20.496 46.301,23.413 46.156,23.558 43.755,23.558
+1.8V_FLIO on Bottom Layer "NONET_L-01_P-001" (solid, pour order 130): 56.741,36.036 57.12,36.415 58.09,36.415 58.254,36.252 58.254,34.772 58.12,34.638 56.862,34.638 56.741,34.759
+1.8V_VCCFQ on Bottom Layer "NONET_L-01_P-001" (solid, remove dead copper, pour order 60): 52.484,39.364 57.188,39.364 57.3,39.252 57.3,38.385 56.655,37.74 56.655,36.448 56.125,35.918 56.125,34.787 56.038,34.699 55.382,34.699 55.135,34.452 55.135,37.967 55.022,38.08 53.668,38.08 53.378,37.79 53.378,36.58 53.575,36.383 55.135,36.383 55.135,34.452 51.971,34.452 51.871,34.552 51.871,36.211 52.321,36.661 52.321,39.201
GND on Bottom Layer "NONET_L-01_P-001" (solid, remove dead copper, pour order 65): 39.611,24.156 28.755,24.156 28.166,24.745 28.166,28.442 28.8,29.076 39.216,29.076 39.873,28.419 39.873,26.438 39.595,26.438 39.595,27.917 39.558,27.953 34.938,27.953 34.666,27.681 32.242,27.681 31.833,28.09 30.345,28.09 30.065,27.81 30.065,26.983 30.191,26.857 32.648,26.857 33.067,26.438 32.755,26.125 32.674,26.206 30.224,26.206 30.065,26.047 30.065,25.061 30.367,24.759 32.088,24.759 32.302,24.973 36.388,24.973 39.492,24.973 39.595,25.076 39.595,26.438 39.873,26.438 39.873,24.418
+3.3V_FLCORE on Bottom Layer "NONET_L-01_P-001" (solid, remove dead copper, pour order 104): 40.014,30.447 40.014,28.77 40.159,28.625 40.159,24.125 40.609,23.675 40.609,22.158 40.813,21.952 42.806,21.952 43.022,22.168 43.022,23.443 42.897,23.568 42.335,23.568 41.585,24.318 41.585,27.51 41.896,27.821 42.975,27.821 43.061,27.907 43.061,28.916 42.997,28.98 41.988,28.98 41.585,29.382 41.585,30.428 41.422,30.591 40.159,30.591
NetC15_2 on Bottom Layer "NONET_L-01_P-001" (solid, remove dead copper, pour order 28): 70.36,40.66 70.36,43.257 70.535,43.433 75.08,43.433 75.18,43.333 75.18,42.551 74.029,41.4 71.33,41.4 70.995,41.066 70.995,40.525 70.495,40.525
+5V_SATA on Bottom Layer "NONET_L-01_P-001" (solid, remove dead copper, pour order 24): 72.342,38.43 72.73,38.43 72.9,38.6 72.9,39.55 72.9,39.74 72.765,39.875 72.22,39.875 72.22,40.225 72.9,40.225 73.067,40.392 73.84,40.392 74.269,39.963 74.269,39.035 74.693,38.61 78.225,38.61 78.519,38.316 80.364,38.316 80.795,37.885 80.795,34.945 80.384,34.534 76.425,34.534 76.03,34.929 76.03,36.92 75.682,37.268 72.298,37.268 72.261,37.305 72.261,38.349
GND on Bottom Layer "NONET_L-01_P-001" (solid, remove dead copper, pour order 25): 71.74,38.374 71.74,37.19 72.162,36.768 75.461,36.768 75.522,36.707 75.522,35.472 75.399,35.349 71.312,35.349 70.58,36.08 70.58,38.388 71.216,39.024 71.216,40.776 72.044,40.776 72.046,39.645 72.71,39.645 72.71,38.79 72.56,38.64 72.006,38.64
+1.5V_DRAM on Bottom Layer "NONET_L-01_P-001" (solid, remove dead copper, pour order 76): 63.422,27.105 61.724,27.105 61.368,26.75 61.368,25.668 60.971,25.27 60.205,25.27 59.982,25.047 59.982,23.873 63.391,23.873 63.593,24.075 63.593,26.934
+1.5V_VDDQ on Bottom Layer "NONET_L-01_P-001" (solid, remove dead copper, pour order 77): 59.252,25.104 58.28,25.104 58.125,24.949 58.125,23.946 57.608,23.429 55.307,23.429 55.135,23.258 55.135,22.147 60.244,22.147 60.452,21.938 60.453,19.974 60.594,19.832 61.709,19.832 62.002,20.126 62.002,23.217 61.76,23.459 59.862,23.459 59.425,23.896 59.425,24.931
+5V_SATA on Bottom Layer "NONET_L-01_P-001" (solid, remove dead copper, pour order 41): 70.366,25.13 73.315,25.13 73.58,25.395 73.58,27.55 73.05,28.08 70.725,28.08 70.283,27.638 70.283,25.213
GND on Bottom Layer "NONET_L-01_P-001" (solid, remove dead copper, pour order 9): 66.875,19.048 67.54,19.713 67.54,21.611 68.383,21.611 68.383,20.541 68.52,20.404 68.968,20.404 69.022,20.351 69.022,19.685 68.887,19.55 68.434,19.55 68.009,19.125 68.009,18.037 67.892,17.92 66.972,17.92 66.875,18.018
PWR_GD on Bottom Layer "NONET_L-01_P-001" (solid, remove dead copper, pour order 102): 30.988,40.336 30.988,42.33 30.868,42.45 28.853,42.45 28.726,42.323 28.726,40.432 28.821,40.336
GND on Bottom Layer "NONET_L-01_P-001" (solid, remove dead copper, pour order 20): 29.027,20.582 27.663,20.582 27.382,20.301 26.054,20.301 26.054,23.696 29.662,23.696 31.75,21.608 31.75,19.668 31.482,19.4 29.33,19.4 29.33,20.28
GND on Bottom Layer "Bottom Layer-GND" (solid, remove dead copper, pour order 59): 45.9,39.862 46.499,39.86 46.499,44.944 47.28,45.725 50.35,45.725 51.037,45.038 51.037,36.593 51.739,36.593 52.088,36.943 52.088,39.557 52.81,40.279 57.764,40.279 57.764,41.326 57.434,41.656 52.869,41.656 52.5,42.025 52.5,46.415 51.805,47.11 45.585,47.11 44.931,46.456 44.931,41.437 45.243,41.125 45.9,41.125 45.9,40.414
GND on Bottom Layer "NONET_L-01_P-001" (solid, remove dead copper, pour order 52): 53.7,22.982 53.7,20.386 53.383,20.069 51.331,20.069 51.029,20.371 51.031,21.127 50.141,21.127 50.141,20.356 49.854,20.069 48.096,20.069 47.787,20.378 47.787,21.127 46.884,21.127 46.884,20.384 46.569,20.069 43.323,20.069 43.013,20.378 43.013,21.511 41.65,21.511 41.25,21.111 41.25,19.329 41.803,18.91 59.929,18.91 60.239,19.22 60.239,21.189 54.81,21.189 54.81,22.982
GND on Bottom Layer "NONET_L-01_P-001" (solid, remove dead copper, pour order 56): 37.954,32.659 38.344,32.27 39.679,32.27 39.679,37.854 40.066,38.246 41.834,38.246 42.11,37.97 42.11,32.425 43.016,32.425 43.016,32.771 43.016,39.481 42.959,39.538 39.093,39.538 37.954,38.399
GND on Bottom Layer "NONET_L-01_P-001" (solid, remove dead copper, pour order 34): 72.283,21.562 72.283,20.948 72.283,20.188 72.12,20.025 72.12,18.262 71.466,17.581 69.837,17.581 69.714,17.458 69.714,16.261 70.091,15.884 74.617,15.884 74.806,16.073 74.806,17.368 73.558,17.368 73.558,19.359 73.689,19.49 74.94,19.49 75.283,19.832 75.283,21.297 75.018,21.562
GND on Bottom Layer "NONET_L-01_P-001" (solid, remove dead copper, pour order 4): 30.754,37.45 30.495,37.45 30.495,39.049 30.746,39.049 30.916,39.218 30.916,39.985 31.175,39.985 31.175,39.22 31.346,39.049 32.095,39.049 32.095,37.45 31.837,37.45 31.675,37.288 31.675,36.147 31.533,36.005 29.62,36.005 29.475,36.15 29.475,36.58 29.556,36.661 30.04,36.661 30.195,36.506 30.195,36.35 30.225,36.32 30.851,36.32 30.925,36.394 30.925,37.279
GND on Bottom Layer "NONET_L-01_P-001" (solid, remove dead copper, pour order 23): 26.504,15.029 26.504,12.721 27.275,11.95 35.161,11.95 36.3,13.089 36.3,14.171 35.984,14.487 34.919,14.487 34.267,13.835 27.312,13.835 27.312,15.029
NetD1_1 on Bottom Layer "NONET_L-01_P-001" (solid, remove dead copper, pour order 15): 26.105,13.479 26.287,13.479 26.287,13.829 25.708,13.829 25.512,14.025 23.1,14.025 23.1,12.825 25.452,12.825
NetD4_1 on Bottom Layer "NONET_L-01_P-001" (solid, remove dead copper, pour order 12): 28.801,36.814 28.801,36.632 28.503,36.334 24.541,36.334 24.315,36.56 24.315,38.4 28.326,38.4 29.126,38.4 29.344,38.182 30.17,38.182 30.17,37.326 29.313,37.326
+5V_SATA on Bottom Layer "NONET_L-01_P-001" (solid, remove dead copper, pour order 14): 31.232,34.293 32.596,34.293 32.755,34.452 32.755,35.966 32.421,36.3 32.421,37.334 32.421,38.121 33.376,38.121 33.577,37.92 33.577,35.021 33.728,34.87 34.517,34.87 34.719,34.668 34.719,33.386 34.939,33.166 36.391,33.166 36.5,33.275 36.5,36.447 36.367,36.58 35.3,36.58 35.119,36.761 35.119,39.864 35.298,40.043 36.665,40.043 36.837,40.215 36.837,41.671 36.784,41.724 33.166,41.724 33.166,40.794 32.714,40.342 31.604,40.342 31.604,42.204 31.851,42.451 37.314,42.461 37.514,42.262 37.514,32.249 36.595,31.33 31.415,31.33 31.036,31.71 31.041,34.101
+3.3V_VCC3 on Bottom Layer "Bottom Layer-+3.3V_VCC3" (solid, remove dead copper, pour order 55): 43.625,24.055 43.71,23.97 44.711,23.97 44.81,24.069 44.81,26.18 45.119,26.49 45.621,26.49 45.73,26.599 45.73,27.346 45.626,27.45 45.045,27.45 44.825,27.67 44.825,29.076 44.469,29.431 43.564,29.431 43.068,29.927 43.068,30.78 41.92,30.78 41.92,29.583 42.178,29.325 43.006,29.325 43.625,28.706
+5V_SATA on Bottom Layer "Bottom Layer-+5V_SATA" (solid, remove dead copper, pour order 33): 68.767,17.866 69.876,17.866 70.195,18.186 71.582,18.186 71.713,18.317 71.713,20.372 71.176,20.883 69.775,20.883 69.521,21.137 69.178,21.137 69.062,21.021 68.537,21.021 68.537,20.671 69.134,20.671 69.32,20.516 69.32,19.43 69.206,19.316 68.777,19.316 68.621,19.16 68.621,18.013
+1.1V_CORE on Bottom Layer "NONET_L-01_P-001" (solid, remove dead copper, pour order 105): 75.4,17.675 78.6,17.675 78.761,17.514 78.761,16.162 78.508,15.91 75.644,15.91 75.4,16.153
+1.1V_CORE on Bottom Layer "NONET_L-01_P-001" (solid, remove dead copper, pour order 103): 45.571,39.796 45.571,40.571 45.293,40.85 43.36,40.85 43.125,40.615 43.125,40.148 43.598,39.675 44.432,39.675 45.423,38.685 45.423,38.15 48.394,38.15 48.394,39.331 48.212,39.513 45.855,39.513
+5V_SATA on Bottom Layer "NONET_L-01_P-001" (solid, remove dead copper, pour order 101): 37.775,40.214 37.775,41.97 38.261,42.456 40.122,42.456 40.243,42.335 40.243,41.441 39.697,40.895 39.697,39.9 38.089,39.9
+1.1V_VP on Bottom Layer "NONET_L-01_P-001" (solid, remove dead copper, pour order 98): 43.635,39.16 43.635,32.27 44.505,32.27 44.873,32.638 44.873,33.14 45.176,33.443 47.355,33.443 47.753,33.841 47.753,35.11 46.768,35.595 46.768,37.592 44.81,37.592 44.81,38.946 44.415,39.34 43.815,39.34
+3.3V_VCCAH on Bottom Layer "NONET_L-01_P-001" (solid, remove dead copper, pour order 50): 40.155,37.87 41.605,37.87 41.605,32.444 41.993,31.99 44.649,31.99 45.104,32.444 46.433,32.444 46.643,32.235 46.643,31.741 46.451,31.549 45.364,31.549 44.929,31.114 40.155,31.114
+3.3V_FLCORE on Bottom Layer "NONET_L-01_P-001" (solid, remove dead copper, pour order 16): 34.087,14.123 27.487,14.128 27.487,14.479 27.975,14.479 28.207,14.711 28.207,15.542 28.415,15.75 33.982,15.75 34.435,15.297 34.435,14.471
+1.1V_CORE on Bottom Layer "Bottom Layer-+1.1V_CORE" (solid, remove dead copper, pour order 17): 23.155,14.783 25.435,14.783 25.435,16.625 25.455,23.163 24.075,23.163 23.735,22.823 23.735,16.475 23.735,16.33 23.155,15.75
GND on Bottom Layer "Bottom Layer-GND 1" (solid, remove dead copper, pour order 22): 14.35,35.189 20.125,35.189 20.125,37.82 22.29,39.985 24.145,39.985 24.145,41.726 23.896,41.975 16.468,41.975 14.35,39.857
NetD3_1 on Bottom Layer "NONET_L-01_P-001" (solid, remove dead copper, pour order 32): 66.818,19.424 67.34,19.946 67.34,20.375 66.901,20.375 66.631,20.5 64.09,20.5 64.09,19.352 64.292,19.15 66.544,19.15
+1.5V_DRAM on Bottom Layer "NONET_L-01_P-001" (solid, remove dead copper, pour order 37): 64.22,21.21 64.22,29.6 64.44,29.82 66.12,29.82 66.33,29.61 66.33,21.21
NetC14_2 on Bottom Layer "Bottom Layer-NetC14_2" (solid, remove dead copper, pour order 38): 66.702,21.325 67.315,21.325 67.315,21.799 67.376,21.861 69.391,21.861 69.55,22.02 69.55,23.81 69.32,24.04 68.34,24.04 67.95,24.43 67.95,25.64 67.82,25.77 66.7,25.77 66.61,25.68 66.61,21.417
GND on Bottom Layer "NONET_L-01_P-001" (solid, remove dead copper, pour order 39): 69.284,30.035 67.008,30.027 67.008,25.96 68.012,25.96 68.211,25.76 68.211,24.449 68.252,24.408 69.47,24.408 69.47,24.732 69.875,24.732 69.875,29.446
NetD2_1 on Bottom Layer "NONET_L-01_P-001" (solid, remove dead copper, pour order 26): 71.02,39.226 71.02,39.575 70.717,39.575 70.62,39.672 67.9,39.672 67.9,38.59 70.081,38.59 70.717,39.226
+1.8V_FLIO on Bottom Layer "NONET_L-01_P-001" (solid, remove dead copper, pour order 27): 67.763,40.42 67.763,48.287 65.404,50.646 65.404,53.409 65.995,54 69.225,54 69.816,53.409 69.816,41.676 70,41.492 70,40.42
GND on Bottom Layer "NONET_L-01_P-001" (solid, remove dead copper, pour order 29): 70.668,49.398 70.668,45.41 73.29,45.41 73.57,45.13 73.57,44.37 75.4,44.37 75.4,48.23 74.232,49.398
GND on Bottom Layer "NONET_L-01_P-001" (solid, remove dead copper, pour order 64): 61.736,37.081 61.736,33.339 62.805,32.27 68.875,32.27 69.525,32.92 69.525,35.401 65.642,35.401 65.642,34.397 65.37,34.125 64.261,34.125 63.875,34.511 63.875,37.081
nDF on Bottom Layer "NONET_L-01_P-001" (solid, remove dead copper, pour order 63): 53.985,31.538 54.551,31.538 54.873,31.86 54.873,32.426 55.067,32.62 55.955,32.62 56.094,32.481 56.094,30.914 55.92,30.74 55.047,30.74 54.615,30.408 54.052,30.408 53.845,30.615 53.845,31.16 53.845,31.398
+3.3V_FLCORE on Bottom Layer "NONET_L-01_P-001" (solid, remove dead copper, pour order 21): 28.395,31.75 15.575,31.75 14.825,32.5 14.825,34.46 23.195,34.46 23.859,34.46 24.128,34.729 28.874,34.731 28.874,32.229
GND on GND (Mid8) "NONET_L-01_P-001" (solid, remove dead copper, pour order 94): 100,67 1.075,67 1.075,57.499 ccw(c1.825,57.499) 1.825,56.749 5.825,56.749 cw(c5.825,56.246) 6.328,56.246 6.328,54.996 ccw(c6.825,54.996) 6.825,54.499 9.575,54.499 cw(c9.575,53.999) 10.075,53.999 10.075,50.999 cw(c9.575,50.999) 9.575,50.499 6.825,50.499 ccw(c6.825,50.003) 6.328,50.002 6.328,41.746 ccw(c7.065,41.746) 7.065,41.009 11.115,41.009 cw(c11.115,40.549) 11.575,40.549 11.575,37.499 cw(c11.075,37.499) 11.075,36.999 6.825,36.999 ccw(c6.824,36.503) 6.328,36.502 6.328,18.02 ccw(c7.032,18.02) 7.032,17.316 9.578,17.316 cw(c9.578,16.59) 10.305,16.589 10.305,14.043 cw(c9.579,14.043) 9.578,13.316 6.828,13.316 ccw(c6.827,12.817) 6.328,12.816 6.328,11.816 cw(c5.582,11.815) 5.581,11.069 2.18,11.069 ccw(c2.25,9.896) 1.078,9.816 1.078,1 100,1
GND on Top Layer "NONET_L-01_P-001" (solid, remove dead copper, pour order 128): 100,67 1.075,67 1.075,57.5 ccw(c1.825,57.5) 1.825,56.75 5.825,56.75 cw(c5.825,56.247) 6.328,56.247 6.328,54.997 ccw(c6.825,54.997) 6.825,54.5 9.575,54.5 cw(c9.575,54) 10.075,54 10.075,51 cw(c9.575,51) 9.575,50.5 6.825,50.5 ccw(c6.825,50.003) 6.328,50.003 6.328,41.747 ccw(c7.065,41.747) 7.065,41.01 11.115,41.01 cw(c11.115,40.55) 11.575,40.55 11.575,37.5 cw(c11.075,37.5) 11.075,37 6.825,37 ccw(c6.824,36.504) 6.328,36.503 6.328,18.021 ccw(c7.032,18.021) 7.032,17.317 9.578,17.317 cw(c9.579,16.59) 10.305,16.59 10.305,14.044 cw(c9.579,14.043) 9.578,13.317 6.828,13.317 ccw(c6.827,12.818) 6.328,12.817 6.328,11.817 cw(c5.582,11.816) 5.581,11.07 2.18,11.07 ccw(c2.25,9.897) 1.078,9.817 1.078,1 100,1
NetKP4_1 on Top Layer "NONET_L-01_P-001" (solid, remove dead copper, pour order 122): 6.325,21.155 6.325,18.072 ccw(c7.11,18.072) 7.11,17.286 11.725,17.286 11.858,17.418 11.858,18.663 11.709,18.812 9.363,18.812 9.363,21.155
+1.8V_VCCFQ on Top Layer "NONET_L-01_P-001" (solid, remove dead copper, pour order 113): 52.5,37.6 55.98,37.6 56.2,37.82 56.2,51.041 47.741,59.5 19,59.5 18.6,59.1 18.6,57.486 19.087,56.999 44.191,56.999 52.13,49.04 52.13,37.97
+1.1V_VCCK on Top Layer "NONET_L-01_P-001" (solid, remove dead copper, pour order 112): 46.999,48.262 46.999,41.907 47.471,41.435 50.088,41.435 50.538,41.884 50.538,49.738 43.775,56.5 19.067,56.5 18.6,56.033 18.6,54.917 19.117,54.4 40.861,54.4
+1.1V_CORE on Top Layer "NONET_L-01_P-001" (solid, remove dead copper, pour order 111): 42.537,41.01 43.082,40.465 43.082,39.789 43.444,39.404 44.754,39.404 45.169,39 45.607,39 45.965,39.358 45.965,40.989 44.754,42.2 44.754,49.901 40.555,54.1 19.223,54.1 18.6,53.477 18.6,52.255 19.283,51.573 38.283,51.573 42.278,47.577 42.278,41.269
+1.1V_VP on Top Layer "NONET_L-01_P-001" (solid, remove dead copper, pour order 110): 44.42,36.294 44.031,36.294 39.245,41.08 39.245,46.419 36.764,48.9 19.111,48.9 18.6,49.411 18.6,50.5 19.2,51.1 37.883,51.1 41.918,47.065 41.918,40.605 43.357,39.166 44.256,39.166 44.681,38.741 44.681,36.555
+3.3V_VCC3F on Top Layer "NONET_L-01_P-001" (solid, remove dead copper, pour order 106): 45.152,23.696 52.625,23.696 53.1,23.221 53.1,15.967 55.117,13.95 75.068,13.95 76.1,12.918 76.1,10.5 75.164,9.564 47.27,9.564 44.953,11.88 44.953,23.497
+1.5V_VDDQ on Top Layer "NONET_L-01_P-001" (solid, remove dead copper, pour order 100): 60.246,23.241 60.245,20.283 60.781,19.747 63.74,19.747 66.1,17.387 67.386,16.102 75.633,16.102 76.1,16.568 76.1,21.802 75.602,22.3 64.881,22.3 63.61,23.571 63.187,23.571 60.576,23.571
+3.3V_VCC3 on Top Layer "NONET_L-01_P-001" (solid, remove dead copper, pour order 107): 18.6,9.9 33.9,9.9 43.1,19.1 43.1,28.5 43.59,28.99 44.564,28.99 44.681,28.873 44.681,17.524 35.157,8 18.7,8 18.1,8.6 18.1,9.4
+1.8V_FLIO on Top Layer "NONET_L-01_P-001" (solid, remove dead copper, pour order 114): 69.795,53.36 69.795,52.366 68.408,52.366 68,51.958 68,50.025 68.347,49.678 78.522,49.678 79,49.2 79,47.8 78.748,47.548 66.452,47.548 65.63,48.37 65.63,53.521 66.123,54.013 69.141,54.013
+3.3V_VCC3 on Top Layer "NONET_L-01_P-001" (solid, remove dead copper, pour order 121): 90.15,49.13 90.15,51.823 90.357,52.03 91.719,52.03 91.95,51.798 91.95,49.13
+1.1V_CORE on Top Layer "NONET_L-01_P-001" (solid, remove dead copper, pour order 116): 78.16,55.471 77.26,55.471 75.506,55.471 75.225,55.189 75.225,53.005 75.454,52.776 76.644,52.776 76.854,52.986 76.854,53.845 77.38,54.371 78.16,54.371
+3.3V_FLCORE on Top Layer "NONET_L-01_P-001" (solid, remove dead copper, pour order 96): 69.793,54.242 69.793,57.157 69.216,57.158 68.894,57.48 66.097,57.48 65.635,57.018 65.635,54.732 66.125,54.242 68.896,54.242
+5V_SATA on Top Layer "NONET_L-01_P-001" (solid, remove dead copper, pour order 123): 11.425,27.112 11.425,23.55 11.875,23.1 22.332,23.1 22.768,23.536 22.768,26.963 22.231,27.5 17.75,27.5 17.5,27.25 17.5,25.25 17.25,25 14.313,25 14,25.313 14,27.293 13.793,27.5 11.813,27.5